# Altium PCB Sensors_Board.PcbDoc (part 2 of 2)
Units mil, origin at the board's own origin, x right, y up, seen from the top; angles counter-clockwise.
Board outline 3925 x 3925 mil, 2 copper layers (Top Layer, Bottom Layer); 82 components, 60 nets, 229 pads, 66 vias.
Unrouted connection lines stored in the file: 61.
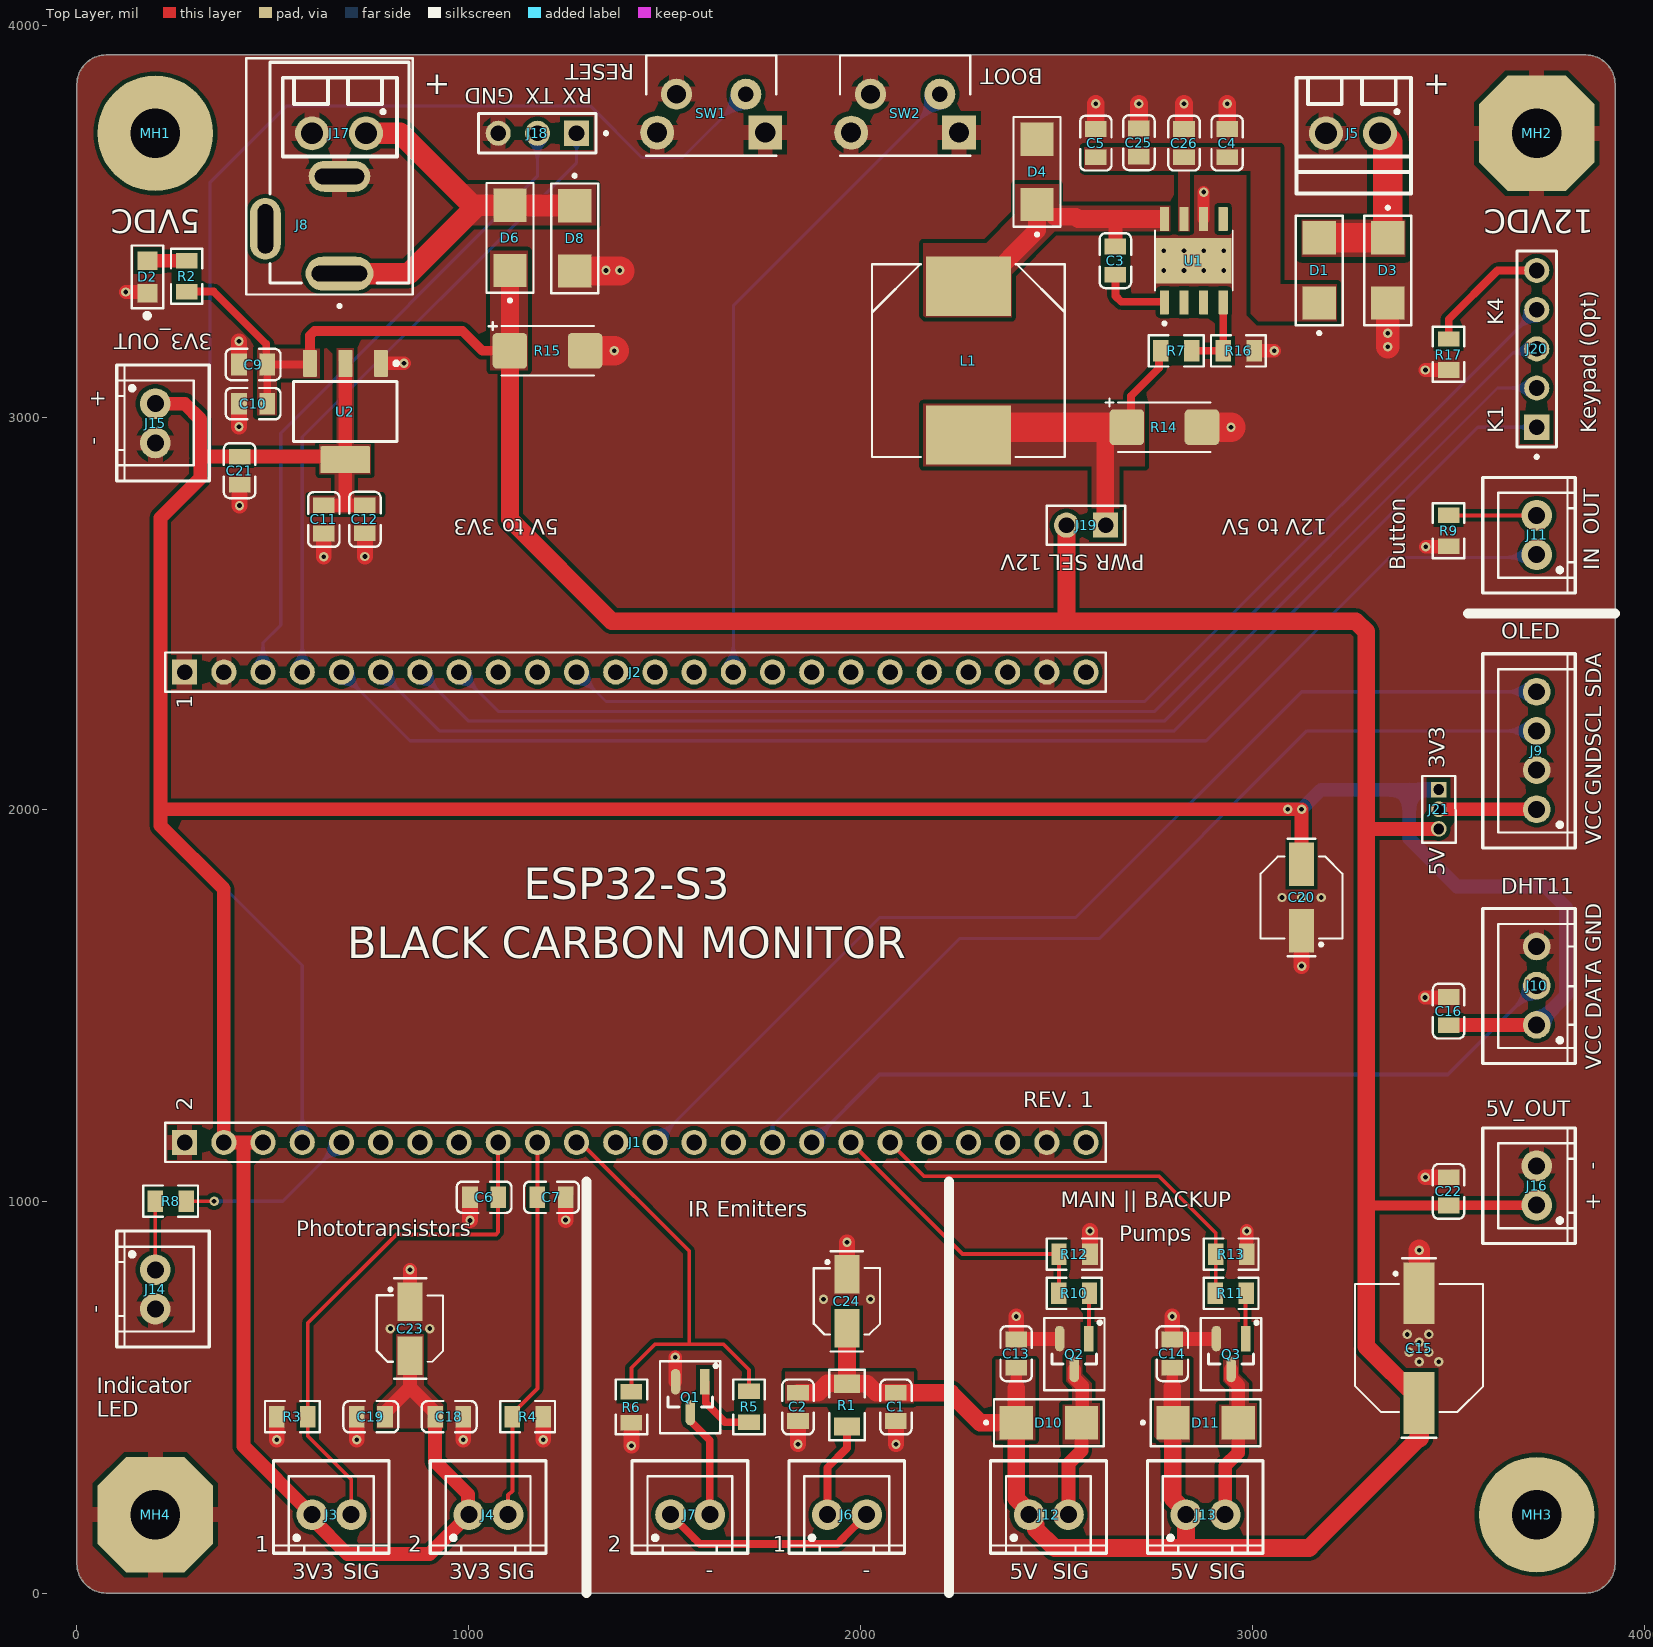
[diagram p0: Top Layer view]

## Part data (continued)
R8: library part RC0805FR-07100RL, "RES 100 OHM 1% 1/8W 0805", Case/Package=0805, LCSC Part Number=C327455, Manufacturer=Yageo, Max Operating Temperature=155°C, Min Operating Temperature=-55°C, Package Height=0.5mm, Package Length=2mm, Package Shape=Rectangular, Package Width=1.25mm, Power=125mW, Rated Temperature=70°C, Resistor Type="FIXED RESISTOR", Supplier Part Number=311-100CRCT-ND, Temperature Coefficient=100ppm/°C, Tolerance=1%, Working Voltage=150V, Additional Feature="LASER TRIMMABLE", Category="Chip SMD Resistors", ComponentLink1Description=https://datasheet.ciiva.com:443/pdfs/VipMasterIC/IC/YAGO/YAGO-S-A0008145938/YAGO-S-A0008145938-1.pdf?src-supplier=IHS+Markit, ComponentLink1URL=https://datasheet.ciiva.com:443/pdfs/VipMasterIC/IC/YAGO/YAGO-S-A0008145938/YAGO-S-A0008145938-1.pdf?src-supplier=IHS+Markit, ComponentLink2Description=https://datasheet.ciiva.com/11808/0900766b8106beab-11808877.pdf?src-supplier=Rs, ComponentLink2URL=https://datasheet.ciiva.com/11808/0900766b8106beab-11808877.pdf?src-supplier=Rs, ComponentLink3Description=https://datasheet.ciiva.com/7941/1697719-7941680.pdf?src-supplier=Element14, ComponentLink3URL=https://datasheet.ciiva.com/7941/1697719-7941680.pdf?src-supplier=Element14, ComponentLink4Description=https://datasheet.ciiva.com/7941/1686128-7941679.pdf?src-supplier=Element14, ComponentLink4URL=https://datasheet.ciiva.com/7941/1686128-7941679.pdf?src-supplier=Element14, ComponentLink5Description=https://datasheet.ciiva.com/46447/444164-46447562.pdf?src-supplier=Element14, ComponentLink5URL=https://datasheet.ciiva.com/46447/444164-46447562.pdf?src-supplier=Element14, ComponentLink6Description=https://datasheet.ciiva.com/2456/pyu-r-int-thick-7-2456989.pdf?src-supplier=Digikey, ComponentLink6URL=https://datasheet.ciiva.com/2456/pyu-r-int-thick-7-2456989.pdf?src-supplier=Digikey, ComponentLink7Description=https://datasheet.ciiva.com/2456/pyu-r-int-thick-7-2456987.pdf?src-supplier=Digikey, ComponentLink7URL=https://datasheet.ciiva.com/2456/pyu-r-int-thick-7-2456987.pdf?src-supplier=Digikey, ComponentLink8Description=https://datasheet.ciiva.com/17082/rc0805-17082697.pdf?src-supplier=Future+Electronics, ComponentLink8URL=https://datasheet.ciiva.com/17082/rc0805-17082697.pdf?src-supplier=Future+Electronics, ComponentLink9Description=https://datasheet.ciiva.com/7660/38627-7660797.pdf?src-supplier=Element14, ComponentLink9URL=https://datasheet.ciiva.com/7660/38627-7660797.pdf?src-supplier=Element14, ComponentLink10Description=https://datasheet.ciiva.com/22747/444164-22747535.pdf?src-supplier=Element14, ComponentLink10URL=https://datasheet.ciiva.com/22747/444164-22747535.pdf?src-supplier=Element14, ComponentLink11Description=https://datasheet.ciiva.com/2456/pyu-r-int-thick-7-2456988.pdf?src-supplier=Digikey, ComponentLink11URL=https://datasheet.ciiva.com/2456/pyu-r-int-thick-7-2456988.pdf?src-supplier=Digikey, Construction=Chip, JESD-609 Code=e3, Manufacturer Part Number=RC0805FR-07100RL, Mounting Technology="Surface Mount", Packaging="Tape and Reel", Pins=2, Pricing="1=0.1, 10=0.017, 50=0.0158, 100=0.0143, 500=0.0102, 1000=0.00816, 5000=0.0051, 10000=0.00408 (USD)", Reach SVHC Compliant=Yes, RoHS=Yes, RoHS Compliant=Yes, Stock=1132709, Supplier=Digikey, Technology="METAL GLAZE/THICK FILM", Terminal Finish=Nickel, Termination=Wraparound
R10 R11: library part CRGCQ0805F220R, "RES 220 OHM 1% 1/8W 0805", LCSC Part Number=C374734, Manufacturer="TE Connectivity", Resistor Type="FIXED RESISTOR", Supplier Part Number=A129741CT-ND, Category="Chip SMD Resistors", ComponentLink1Description=https://datasheet.ciiva.com:443/pdfs/VipMasterIC/IC/TYEL/TYEL-S-A0004929575/TYEL-S-A0004929575-1.pdf?src-supplier=IHS+Markit, ComponentLink1URL=https://datasheet.ciiva.com:443/pdfs/VipMasterIC/IC/TYEL/TYEL-S-A0004929575/TYEL-S-A0004929575-1.pdf?src-supplier=IHS+Markit, ComponentLink2Description=https://www.te.com/commerce/DocumentDelivery/DDEController?Action=srchrtrv&amp;DocNm=1773204-3&amp;DocType=DS&amp;DocLang=English&src-supplier=Digikey, ComponentLink2URL=https://www.te.com/commerce/DocumentDelivery/DDEController?Action=srchrtrv&amp;DocNm=1773204-3&amp;DocType=DS&amp;DocLang=English&src-supplier=Digikey, ComponentLink3Description=https://4donline.ihs.com/images/VipMasterIC/IC/TYEL/TYEL-S-A0004929575/TYEL-S-A0004929575-1.pdf?hkey=52A5661711E402568146F3353EA87419&src-supplier=Farnell, ComponentLink3URL=https://4donline.ihs.com/images/VipMasterIC/IC/TYEL/TYEL-S-A0004929575/TYEL-S-A0004929575-1.pdf?hkey=52A5661711E402568146F3353EA87419&src-supplier=Farnell, ComponentLink4Description=https://4donline.ihs.com/images/VipMasterIC/IC/TYEL/TYEL-S-A0004929575/TYEL-S-A0004929575-1.pdf?hkey=52A5661711E402568146F3353EA87419&src-supplier=Newark, ComponentLink4URL=https://4donline.ihs.com/images/VipMasterIC/IC/TYEL/TYEL-S-A0004929575/TYEL-S-A0004929575-1.pdf?hkey=52A5661711E402568146F3353EA87419&src-supplier=Newark, ComponentLink5Description=https://datasheet.octopart.com/CRGCQ0805F220R-TE-Connectivity-datasheet-114679081.pdf?src-supplier=Master+Electronics, ComponentLink5URL=https://datasheet.octopart.com/CRGCQ0805F220R-TE-Connectivity-datasheet-114679081.pdf?src-supplier=Master+Electronics, Manufacturer Part Number=CRGCQ0805F220R, Pins=2, Pricing="1=0.1, 10=0.033, 50=0.0206, 100=0.0171, 500=0.01168, 1000=0.01008 (USD)", Reach SVHC Compliant=Yes, RoHS=Yes, RoHS Compliant=Yes, Stock=1167728, Supplier=Digikey
R14 R15: library part TAJC227K006RNJ, "Tantalum Capacitor, Polarized, Tantalum (dry/solid), 6.3V, 10% +Tol, 10% -Tol, 220uF, Surface Mount, 2312", Capacitor Type=Tantalum, Case/Package=2312, ESR (Equivalent Series Resistance)=1.2R, Leakage Current=13.9uA, Manufacturer="Kyocera AVX", Max Operating Temperature=125°C, Min Operating Temperature=-55°C, Package Shape=Rectangular, Package Style=SMTMeter, Rated DC Voltage (URdc)=6.3V, Supplier Part Number=478-1713-1-ND, Tolerance  (fill in as +-)=10%, Category="Tantalum Capacitors", ComponentLink1Description=https://datasheet.ciiva.com:443/pdfs/VipMasterIC/IC/AVXC/AVXC-S-A0008794508/AVXC-S-A0008794508-1.pdf?src-supplier=IHS+Markit, ComponentLink1URL=https://datasheet.ciiva.com:443/pdfs/VipMasterIC/IC/AVXC/AVXC-S-A0008794508/AVXC-S-A0008794508-1.pdf?src-supplier=IHS+Markit, ComponentLink2Description=https://datasheet.ciiva.com/11793/0900766b80ccdc61-11793155.pdf?src-supplier=Rs, ComponentLink2URL=https://datasheet.ciiva.com/11793/0900766b80ccdc61-11793155.pdf?src-supplier=Rs, ComponentLink3Description=https://datasheet.ciiva.com/26341/559452-da-01-en-tacc-c-6-0-mm-x-3-2-mm-x-2-6-mm-220-uf-26341792.pdf?src-supplier=Conrad, ComponentLink3URL=https://datasheet.ciiva.com/26341/559452-da-01-en-tacc-c-6-0-mm-x-3-2-mm-x-2-6-mm-220-uf-26341792.pdf?src-supplier=Conrad, ComponentLink4Description=https://datasheet.ciiva.com/18710/taj-eng-18710873.pdf?src-supplier=Distrelec, ComponentLink4URL=https://datasheet.ciiva.com/18710/taj-eng-18710873.pdf?src-supplier=Distrelec, ComponentLink5Description=https://datasheet.ciiva.com/7773/1680476-7773710.pdf?src-supplier=Element14, ComponentLink5URL=https://datasheet.ciiva.com/7773/1680476-7773710.pdf?src-supplier=Element14, ComponentLink6Description=https://datasheet.ciiva.com/7773/1680476-7773711.pdf?src-supplier=Element14, ComponentLink6URL=https://datasheet.ciiva.com/7773/1680476-7773711.pdf?src-supplier=Element14, ComponentLink7Description=https://datasheet.ciiva.com/5935/13070-5935479.pdf?src-supplier=Farnell, ComponentLink7URL=https://datasheet.ciiva.com/5935/13070-5935479.pdf?src-supplier=Farnell, ComponentLink8Description=https://datasheet.ciiva.com/264/taj-264613.pdf?src-supplier=Digikey, ComponentLink8URL=https://datasheet.ciiva.com/264/taj-264613.pdf?src-supplier=Digikey, ComponentLink9Description=https://datasheet.ciiva.com/264/taj-264612.pdf?src-supplier=Digikey, ComponentLink9URL=https://datasheet.ciiva.com/264/taj-264612.pdf?src-supplier=Digikey, ComponentLink10Description=https://datasheet.ciiva.com/264/taj-264614.pdf?src-supplier=Digikey, ComponentLink10URL=https://datasheet.ciiva.com/264/taj-264614.pdf?src-supplier=Digikey, ComponentLink11Description=https://datasheet.ciiva.com/12883/taj-27497-12883273.pdf?src-supplier=Mouser, ComponentLink11URL=https://datasheet.ciiva.com/12883/taj-27497-12883273.pdf?src-supplier=Mouser, ComponentLink12Description=https://datasheet.ciiva.com/14600/70001050-14600889.pdf?src-supplier=Allied+Electronics, ComponentLink12URL=https://datasheet.ciiva.com/14600/70001050-14600889.pdf?src-supplier=Allied+Electronics, ComponentLink13Description=https://datasheet.ciiva.com/14599/70001050-14599311.pdf?src-supplier=Allied+Electronics, ComponentLink13URL=https://datasheet.ciiva.com/14599/70001050-14599311.pdf?src-supplier=Allied+Electronics, ComponentLink14Description=https://datasheet.ciiva.com/16492/taj-16492906.pdf?src-supplier=Future+Electronics, ComponentLink14URL=https://datasheet.ciiva.com/16492/taj-16492906.pdf?src-supplier=Future+Electronics, Dielectric Material=Tantalum, Height=2.6mm, JESD-609 Code=e3, Length=6mm, Manufacturer Part Number=TAJC227K006RNJ, Mounting Technology="Surface Mount", Packaging="Tape and Reel", Pins=2, Polarity=Polarized, Pricing="1=0.91, 10=0.555, 50=0.4142, 100=0.3705, 500=0.29584, 1000=0.27254, 1500=0.26081, 2500=0.24777, 3500=0.24011, 5000=0.23273, 12500=0.21674, 25000=0.20703, 50000=0.19899 (USD)", Reach SVHC Compliant=Yes, Reference Standard=CECC30801-005, RoHS=Yes, RoHS Compliant=Yes, Stock=3416, Supplier=Digikey, Tan Delta=0.08, Terminal Finish=Nickel, Termination="J BEND", Tolerance (fill in as +-)=10%, Width=3.2mm
R16: library part RC0805FR-073K3L, "125mW ±1% 3.3kΩ 0805 Chip Resistor - Surface Mount ROHS", Case/Package=0805, LCSC Part Number=C269541, Manufacturer=Yageo, Max Operating Temperature=155°C, Min Operating Temperature=-55°C, Package Height=0.5mm, Package Length=2mm, Package Shape=Rectangular, Package Width=1.25mm, Power=125mW, Rated Temperature=70°C, Resistor Type="FIXED RESISTOR", Supplier Part Number=311-3.30KCRCT-ND, Temperature Coefficient (ppm/Cel)=100, Tolerance=1%, Working Voltage=150V, Additional Feature="LASER TRIMMABLE", Category="Chip SMD Resistors", ComponentLink1Description=https://datasheet.ciiva.com:443/pdfs/VipMasterIC/IC/YAGO/YAGO-S-A0008145938/YAGO-S-A0008145938-1.pdf?src-supplier=IHS+Markit, ComponentLink1URL=https://datasheet.ciiva.com:443/pdfs/VipMasterIC/IC/YAGO/YAGO-S-A0008145938/YAGO-S-A0008145938-1.pdf?src-supplier=IHS+Markit, Construction=Chip, JESD-609 Code=e3, Manufacturer Part Number=RC0805FR-073K3L, Mounting Technology="Surface Mount", Packaging="Tape and Reel", Pins=2, Pricing="1=0.1, 10=0.016, 50=0.0132, 100=0.0102, 500=0.00868, 1000=0.00781 (USD)", Reach SVHC Compliant=Yes, RoHS=Yes, RoHS Compliant=Yes, Stock=1112941, Supplier=Digikey, Technology="METAL GLAZE/THICK FILM", Terminal Finish=Nickel, Termination=Wraparound
SW1 SW2: "Tactile Switch SPST-NO Side Actuated Through Hole, Right Angle"
U1: "Step-down type Adjustable 1.221V~32.04V 3A 5.5V~36V SOIC-8-EP DC-DC Converters ROHS", Case/Package=HLSOP, Frequency=600kHz, LCSC Part Number=C9864, Manufacturer="Texas Instruments", Max Operating Temperature=125°C, Max Output current=6A, Max Supply Voltage=36V, Min Input Voltage=5.5V, Min Operating Temperature=-40°C, Nominal Supply Voltage=12V, Package Body Material=Plastic, Package Equivalence Code=SOP8,.25, Package Shape=Rectangular, Package Style="SMALL OUTLINE, HEAT SINK/SLUG, LOW PROFILEMeter", Peak Reflow Temperature (Cel)=260°C, Supplier Part Number=296-26988-1-ND, Temperature Grade=AUTOMOTIVE, Category="Voltage Regulators - Switching", Channels=1, ComponentLink1Description=https://www.ti.com:443/lit/ds/symlink/tps5430.pdf?src-supplier=IHS+Markit, ComponentLink1URL=https://www.ti.com:443/lit/ds/symlink/tps5430.pdf?src-supplier=IHS+Markit, ComponentLink2Description=https://datasheet.ciiva.com/27052/1523997-27052321.pdf?src-supplier=Jameco, ComponentLink2URL=https://datasheet.ciiva.com/27052/1523997-27052321.pdf?src-supplier=Jameco, ComponentLink3Description=https://datasheet.ciiva.com/15113/getdatasheetpartid-214658-15113401.pdf?src-supplier=Verical, ComponentLink3URL=https://datasheet.ciiva.com/15113/getdatasheetpartid-214658-15113401.pdf?src-supplier=Verical, ComponentLink4Description=https://datasheet.ciiva.com/41462/001014839-da-01-en-ic-reg-buck-adj-3-tps5430ddar-soic-8-tid-41462684.pdf?src-supplier=Conrad, ComponentLink4URL=https://datasheet.ciiva.com/41462/001014839-da-01-en-ic-reg-buck-adj-3-tps5430ddar-soic-8-tid-41462684.pdf?src-supplier=Conrad, ComponentLink5Description=https://datasheet.ciiva.com/2035/tps5431-2035207.pdf?src-supplier=Digikey, ComponentLink5URL=https://datasheet.ciiva.com/2035/tps5431-2035207.pdf?src-supplier=Digikey, ComponentLink6Description=https://datasheet.ciiva.com/2035/tps5431-2035206.pdf?src-supplier=Digikey, ComponentLink6URL=https://datasheet.ciiva.com/2035/tps5431-2035206.pdf?src-supplier=Digikey, ComponentLink7Description=https://datasheet.ciiva.com/2035/tps5431-2035208.pdf?src-supplier=Digikey, ComponentLink7URL=https://datasheet.ciiva.com/2035/tps5431-2035208.pdf?src-supplier=Digikey, Control Mode=VOLTAGE-MODE, Control Technique="PULSE WIDTH MODULATION", Height - Seated (Max)=1.68mm, JESD-30 Code=R-PDSO-G8, JESD-609 Code=e4, Length=4.89mm, Manufacturer Part Number=TPS5430DDAR, Moisture Sensitivity Level=1, Pins=8, Pricing="1=4, 10=3.024, 25=2.78, 100=2.5118, 250=2.38388, 500=2.30678, 1000=2.24331, 2500=2.1763 (USD)", Qualification Status="Not Qualified", Reach SVHC Compliant=Yes, RoHS=Yes, RoHS Compliant=Yes, Stock=3440, Supplier=Digikey, Surface Mount=Yes, Switcher Configuration=BUCK, Technology=MOS, Terminal Finish=Nickel, Terminal Form="Gull Wing", Terminal Pitch=1.27mm, Terminal Position=DUAL, Throw Configuration="SWITCHING REGULATOR", Width=3.9mm
U2: "IC REG LINEAR 3.3V 800MA SOT223", LCSC Number Part=C411821, Manufacturer="TI National Semiconductor", Supplier Part Number=LM1117MP-3.3/NOPBCT-ND, Category="Voltage Regulators - Linear", Manufacturer Part Number=LM1117MP-3.3/NOPB, Pricing="1=1.38, 10=1.007, 25=0.9128, 100=0.8093, 250=0.75996, 500=0.73016 (USD)", RoHS=Yes, Stock=63878, Supplier=Digikey

## Via types
v1: diameter 24, hole 12, Top Layer to Bottom Layer, tented both sides, 66 vias

## Nets (pads, with @x,y where several pads share a name; then routed paths per layer and width w, separated by ;. In a path a pad name is that pad's centre, name@x,y a point inside that pad or via, vN(x,y) a via of type N, cw(c..) or ccw(c..) an arc to the next point about the centre after c; other vN are vias at no path point)
3V3: C11.2 C12.2 C16.2 C18.2 C19.2 C20.1 C21.2 C23.1 J1.2 J1.3 J3.1 J4.1 J10.1 J15.1 J21.1 U2.2 U2.4 | length 9690.3
  Top Layer w35: J15.1 275,3035 315,2995 315,2900 ; J1.3 425,1150 ; C11.2 630.43,2776 685,2776 ; U2.2 U2.4 ; C12.2 685,2776 ; C19.2 788.5,452.5 788.5,463.5 842.07,517.07 ; C23.1@850,600 850,525 911.5,463.5 911.5,452.5 C18.2 914,336 997.82,252.18 997.82,202.18 J4.1 900,100 690,100 600,190 J3.1 425,375 425,1150 ; C20.1@3125,1866.14 v1(3125,2000) 213.5,2000 ; C16.2 3500.5,1449.5 3724.5,1449.5 J10.1 ; 213.5,2000 213.5,2743.5 315,2845 315,2892.5 322.5,2900 C21.2 676.97,2900 U2.4 ; 213.5,2000 213.5,1958.17 375,1796.67 J1.2 425,1150 ; 685,2776 U2.4
  Bottom Layer w35: v1(3090,2000) v1(3125,2000) 3175,2050 3400,2050 ; J21.1 3400,2050 ; J10.1 3800,1525 3800,1750 3746.8,1803.2 3521.8,1803.2 3400,1925 3400,2050
5V: C1.2 C2.2 C9.2 C10.2 C13.2 C14.2 C15.1 C22.2 C24.1 D6.2 D10.2 D11.2 J12.1 J13.1 J16.1 J19.2 J21.3 R1.1 R2.2 R15.1 U2.3 | length 9813
  Top Layer w20: R2.2 349,3321 483.07,3186.93 483.07,3137.5 C9.2 ; C10.2 C9.2 ; U2.3 591.42,3135 C9.2
  Top Layer w25: U2.3 594.45,3208.99 606.16,3220.71 984.29,3220.71 1035,3170 R15.1 R15.1@1105,3171.57 ; 3290,989 C22.2 3500.5,989.5 3724.5,989.5 J16.1
  Top Layer w30: 2396.73,523.27 C13.2 ; 2795,525 C14.2
  Top Layer w35: 3290,1950 J21.3
  Top Layer w45: R15.1 1105,2740 1365,2480 2525,2480 ; R15.1@1105,3171.57 D6.2 ; C2.2 1891,511 1915,535 1964.37,535 R1.1 ; C24.1@1965,660 R1.1 ; 2396.73,523.27 D10.2 ; J12.1@2430,196.86 J12.1 ; J19.2 2525,2480 ; D11.2@2795,436.73 2795,525 ; D11.2 2796.73,240.27 2830,207 J13.1 2830,130 ; 2827.07,127.07 2830,130 ; 3425,396 3156.07,127.07 3144,115 2815,115 ; C15.1 3425,494.37 3290,629.37 3290,989 3290,1950 3290,2453.64 3263.64,2480 2525,2480 ; R1.1 2016.43,534.37 2039.79,511 C1.2 2229,511 2305,435 D10.2 ; D10.2 2396.73,240.27 2430,207 J12.1 ; J12.1 2430,190.87 2446.87,174 2446.87,163.13 2495,115 2815,115 ; 2815,115 2830,130
  Top Layer w50: 3425,396 C15.1
5V_Ext: D6.1 D8.2 J8.1 J17.1 | length 1037.4
  Top Layer w55: J8.1 846.97,3366.97 1021.54,3541.54 ; J17.1 825,3725 1008.46,3541.54 1021.54,3541.54 ; D8.2@1273.34,3536.66 D8.2 1269.23,3540.77 1105.77,3540.77 D6.1 1021.54,3541.54
5V_SW: J19.1 L1.2 R7.2 R14.1 | length 893.8
  Top Layer w20: L1.2 L1.2@2295,2975 ; 2624,2975 2625,2974 ; R14.1 2690,2985.87 2690,3055 2760.79,3125.79 2760.79,3164.79 R7.2
  Top Layer w45: J19.1@2624,2726 2624,2975
  Top Layer w75: L1.2@2295,2975 2624,2975 R14.1
12V_Ext: D1.1 D3.2 J5.1 | length 450
  Top Layer w75: D1.1 D3.2 3345,3701.86 3325,3721.86 J5.1
CON_GPIO0: J2.15 SW2.1 | length 1710.6
  Top Layer w10: SW2.1@2189.95,3812.79 SW2.1
  Bottom Layer w8: J2.15 1675,3285 2202.17,3812.17 SW2.1
CON_HEADER_N: J2.21
CON_HEADER_P: J2.20
EN: J1.4 SW1.1 | length 4225.6
  Top Layer w35: SW1.1@1707.17,3813.16 SW1.1
  Bottom Layer w8: J1.4 575,1601.45 223,1953.45 223,2733 340,2850 340,3600 535,3795 1310,3795 1441.73,3663.27 1545.43,3663.27 SW1.1
GND: C1.1 C2.1 C4.1 C5.1 C6.1 C7.1 C9.1 C10.1 C11.1 C12.1 C13.1 C14.1 C15.2 C16.1 C18.1 C19.1 C20.2 C21.1 C22.1 C23.2 C24.2 C25.1 C26.2 D2.2 D3.1 D4.1 D8.1 J1.1 J1.23 J2.1 J2.2 J2.23 J5.2 J8.2 J9.2 J10.3 J14.2 J15.2 J16.2 J17.2 J18.3 MH2.1 MH4.1 Q1.2 Q2.2 Q3.2 R3.1 R4.1 R6.1 R9.1 R12.1 R13.1 R14.2 R15.2 R16.1 R17.1 SW1.2 SW1.S1 SW1.S2 SW2.2 SW2.S1 SW2.S2 U1.6 U1.9 U2.1 | length 2611.6
  Top Layer w20: Q1.2@1526.91,540.08 Q1.2
  Top Layer w30: 2600,3761 2605,3756 ; U1.6 v1(2875,3575)
  Top Layer w35: v1(125,3320) 177.32,3320 D2.2 ; U2.1 v1(834.55,3138.03) ; C23.2@850,769.29 v1(850,825) ; Q1.2@1526.91,540.08 v1(1526.91,602.01) ; C13.1 2397.93,648.2 Q2.2@2500,648.2 ; C14.1 2796.2,648.2 Q3.2@2900,648.2 ; R13.1 v1(2985,924) ; R16.1 v1(3055,3170) ; v1(3440,1520) 3499,1520 C16.1 ; v1(3441,3121) R17.1 ; v1(3441.59,2669.8) R9.1@3500.59,2669.8
  Top Layer w40: v1(413.57,2976) C10.1 ; C9.1 v1(413.57,3194) ; v1(415,2775) C21.1 ; v1(510,391) R3.1 ; v1(630,2644.57) C11.1 ; v1(714,391) C19.1 ; v1(735,2645) C12.1 ; v1(986,391) C18.1 ; v1(1003,951) C6.1 ; v1(1190,391) R4.1 ; v1(1247,952) C7.1 ; v1(1415,376) R6.1 ; v1(1840,380) C2.1 ; C24.2@1965,829.29 v1(1965,895) ; v1(2090,380) C1.1 ; C13.1 v1(2396.73,706) ; R12.1 v1(2585,924) ; C14.1 v1(2795,706) ; v1(3125,1600) C20.2@3125,1675 ; v1(3441,1061) C22.1
  Top Layer w45: 2600,3761 v1(2600,3800) ; 2710,3762 v1(2710,3800) ; 2825,3761 v1(2825,3800) ; 2935,3761 v1(2935,3800)
  Top Layer w55: C15.2@3425,796.26 v1(3425,875)
  Top Layer w60: v1(3345,3180) v1(3345,3215) D3.1
  Top Layer w75: D8.1 v1@1385,3373.46 ; R15.2 v1(1370.87,3170) ; R14.2 v1(2945,2975)
  other v1: 3425,590 3475,590 3400,615 3450,615 3425,640 3395,660 3450,660 800,675 900,675 1905,750 2025,750 3075,1775 3125,1775 3175,1775 1350,3375 1385,3375 2773.23,3375 2825,3375 2875.59,3375 2926.77,3375 2825,3425 2875.59,3425 2773.23,3425.59 2926.77,3425.59
GPIO1: J2.5 J11.1 | length 3319.2
  Bottom Layer w8: J2.5 850,2175 2881.57,2175 3349.37,2642.8 3717.8,2642.8 J11.1
GPIO2: J2.6 J20.1 | length 3333.1
  Bottom Layer w8: J2.6 925,2200 2800,2200 3575,2975 J20.1
GPIO3: J1.14
GPIO4: J1.5 R8.1 | length 458.1
  Top Layer w8: R8.1 v1(350,1000)
  Bottom Layer w8: v1(350,1000) 525,1000 J1.5
GPIO5: J1.6
GPIO6: J1.7
GPIO7: J1.8
GPIO8: J1.13 J9.4 | length 2726.3
  Bottom Layer w8: J1.13 2049.34,1724.34 2549.34,1724.34 3125,2300 J9.4
GPIO9: J1.16 J9.3 | length 2410.1
  Bottom Layer w8: J1.16 1775,1193.01 2251.99,1670 2608.64,1670 3138.64,2200 J9.3
GPIO10: J1.17 J10.2 | length 2015.7
  Bottom Layer w10: J1.17 2048,1323 3498,1323 J10.2
GPIO11: J1.18 R10.1 R12.2 | length 749.5
  Top Layer w10: J1.18 2260,865 R12.2 2506,766 R10.1
GPIO12: J1.19 R11.1 R13.2 | length 1081.1
  Top Layer w10: J1.19 2161.42,1063.58 2761.42,1063.58 2906,919 2906,766 R11.1
GPIO13: J1.20
GPIO14: J1.21
GPIO15: C6.2 J1.9 J3.2 R3.2 | length 1346.2
  Top Layer w10: J3.2 700,290 589,401 R3.2 589,689 815,915 1069.14,915 1075,920.86 J1.9
GPIO16: C7.2 J1.10 J4.2 R4.2 | length 992.6
  Top Layer w10: J4.2@1108.16,208.16 J4.2 1100,250 1111,261 R4.2 1111,458 1175,522 C7.2 J1.10
GPIO17: J1.11 R5.1 R6.2 | length 1107.7
  Top Layer w10: J1.11 1285,1150 1562.5,872.5 1562.5,635 ; R6.2 1415,575 1475,635 1562.5,635 ; R5.1 1715,570 1650,635 1562.5,635
GPIO18: J1.12
GPIO21: J2.19
GPIO35: J2.14
GPIO36: J2.13
GPIO37: J2.12
GPIO38: J2.11 J20.4 | length 2895.3
  Bottom Layer w8: J2.11 1350,2275 2725,2275 J20.4
GPIO39: J2.10
GPIO40: J2.9
GPIO41: J2.8 J20.3 | length 3174.6
  Bottom Layer w8: J2.8 1075,2250 2750,2250 3664.66,3164.66 3714.66,3164.66 J20.3
GPIO42: J2.7 J20.2 | length 3253.9
  Bottom Layer w8: J2.7 1000,2225 2775,2225 3625,3075 J20.2
GPIO45: J2.16
GPIO46: J1.15
GPIO47: J2.18
GPIO48: J2.17
NetC3_1: C3.1 U1.1 | length 185.8
  Top Layer w20: C3.1 2650,3310 2665,3295 2773.7,3295 U1.1
NetC3_2: C3.2 D4.2 L1.1 U1.8 | length 677.6
  Top Layer w20: C3.2 2654,3436 C3.2@2650,3440 ; 2650,3494.58 2661.72,3506.3
  Top Layer w30: D4.2 2477.5,3515.96 2491.11,3515.96 2495.07,3512 ; 2549,3512 2554.7,3506.3
  Top Layer w35: C3.2@2650,3440 2650,3494.58
  Top Layer w45: L1.1@2307.71,3335 2450,3477.29 D4.2 ; 2495.07,3512 2549,3512 ; 2554.7,3506.3 2661.72,3506.3 U1.8@2764,3506.3
NetC4_2: C4.2 C5.2 C25.2 C26.1 D1.2 U1.7
NetD2_1: D2.1 R2.1 | length 100
  Top Layer w35: D2.1@187.83,3400 R2.1@287.83,3400
NetD10_1: D10.1 J12.2 Q2.3 | length 393.4
  Top Layer w35: J12.2 2530,330 2563.27,363.27 D10.1 2565,436.73 2565,528.93 2545,548.93 Q2.3
NetD11_1: D11.1 J13.2 Q3.3 | length 392
  Top Layer w20: 2963.27,530 2963.27,530.66
  Top Layer w35: J13.2 2930,325 2963.27,358.27 D11.1 2963.27,530 ; Q3.3 2945,548.93 2963.27,530.66
NetJ6_1: J6.1 R1.2 | length 245.7
  Top Layer w20: J6.1 1915,320 1965,370 R1.2
NetJ6_2: J6.2 J7.1 | length 562.1
  Top Layer w20: J7.1 1575.43,139.57 1590,125 1940,125 1954.57,139.57 J6.2
NetJ7_2: J7.2 Q1.3 | length 281.3
  Top Layer w20: Q1.3 1565,440.04 1615,390.04 J7.2
NetJ11_2: J11.2 R9.2 | length 230.7
  Top Layer w10: R9.2@3500,2746 R9.2 ; R9.2@3500,2754 3504,2750 J11.2
NetJ14_1: J14.1 R8.2 | length 175
  Top Layer w8: J14.1 R8.2
NetJ20_5: J20.5 R17.2 | length 326.8
  Top Layer w20: R17.2 3500.62,3200.62 3500.62,3250.62 3625,3375 J20.5
NetQ1_1: Q1.1 R5.2 | length 185.8
  Top Layer w20: Q1.1 1604.45,537.34 1604.45,485.55 1654,436 R5.2
NetQ2_1: Q2.1 R10.2 | length 116.3
  Top Layer w10: Q2.1 2582.4,763.4 R10.2
NetQ3_1: Q3.1 R11.2 | length 116.3
  Top Layer w10: Q3.1 2982.4,763.4 R11.2
NetR7_1: R7.1 R16.2 U1.4 | length 208.7
  Top Layer w20: R7.1@2840,3170 R7.1 R16.2 U1.4
RXD0: J2.4 J18.1 | length 1664.9
  Bottom Layer w8: J2.4 575,2950 1275,3650 J18.1
TXD0: J2.3 J18.2 | length 1664.9
  Bottom Layer w8: J2.3 475,2425 520,2470 520,2960 1175,3615 J18.2
VCC: J9.1 J21.2 | length 250
  Top Layer w35: J21.2 J9.1
pads on no net: J1.22 J1.24 J2.22 J2.24 J8.3 MH1.1 MH3.1 U1.2 U1.3 U1.5

## Polygon pours and split planes (outlines as drawn)
5V on Top Layer "5V_L01_P007" (solid, pour order 7): 2345,595 2445,595 2445,390 2345,390
GND on Top Layer "GND_L01_P045" (solid, remove dead copper, pour order 45): 0,75 0,3850 cw(c75,3850) 75,3925 3850,3925 cw(c3850,3850) 3925,3850 3925,75 cw(c3850,75) 3850,0 75,0 cw(c75,75)
12V_Ext on Top Layer "12V_EXT_L01_P044" (solid, pour order 44): 3125,3505 3390,3505 3390,3410 3125,3410
NetD11_1 on Top Layer "NETD11_1_L01_P043" (solid, pour order 43): 2965,605 2965,560 2990,535 2990,485 3010,485 3010,380 2915,380 2915,480 2940,480 2940,525 2925,540 2925,605
NetD10_1 on Top Layer "NETD10_1_L01_P042" (solid, pour order 42): 2565,605 2565,560 2590,535 2590,485 2610,485 2610,380 2515,380 2515,480 2540,480 2540,525 2525,540 2525,605
3V3 on Top Layer "3V3_L01_P041" (solid, pour order 41): 815,660 885,660 885,530 935,480 935,420 765,420 765,480 815,530
5V on Top Layer "5V_L01_P040" (solid, pour order 40): 1807.5,485 1807.5,565 2135,565 2135,485
3V3 on Top Layer "Top Layer-3V3" (solid, pour order 39): 592.5,2755 777.5,2755 777.5,2800 707.5,2800 707.5,2855 750,2855 750,2932 706,2932 706,3177 663.5,3177 662.5,2932 619,2932 619,2855 657.5,2855 657.5,2800 592.5,2800
5V on Top Layer "5V_L01_P037" (solid, pour order 37): 510,3005 460,3005 460,3175 620,3175 620,3100 510,3100
5V on Top Layer "5V_L01_P036" (solid, pour order 36): 1055,3425 1150,3425 1150,3120 1055,3120
5V_Ext on Top Layer "5V_EXT_L01_P035" (solid, pour order 35): 1325,3595 1325,3490 985,3490 985,3595
5V_SW on Top Layer "Top Layer-5V_SW" (solid, pour order 26): 2590,2690 2660,2690 2660,2875 2725,2875 2725,3035 2160,3035 2160,2875 2590,2875
NetC3_2 on Top Layer "Top Layer-NetC3_2" (solid, pour order 29): 2165,3255 2385,3255 2385,3365 2495,3475 2790,3475 2790,3540 2510,3540 2505,3545 2505,3595 2395,3595 2395,3520 2320,3445 2160,3445 2160,3260
NetC4_2 on Top Layer "Top Layer-NetC4_2" (solid, pour order 24): 2810,3475 2840,3475 2840,3630 2995,3630 2995,3265 3015,3245 3215,3245 3215,3340 3070,3340 3070,3690 2570,3690 2570,3630 2810,3630
5V on Top Layer "5V_L01_P008" (solid, pour order 8): 2750.89,595 2840,595 2840,385 2749.11,385
GND on Bottom Layer "GND_L02_P047" (solid, remove dead copper, pour order 47): 0,75 0,3850 cw(c75,3850) 75,3925 3850,3925 cw(c3850,3850) 3925,3850 3925,75 cw(c3850,75) 3850,0 75,0 cw(c75,75)

## Silkscreen, mask and mechanical layers (free items; w line width, h text height)
Top Overlay:
  lines w25: 1300,0 1300,1050 ; 2225,0 2225,1050 ; 3550,2500 3925,2500
  text "RESET" at 1422.4,3900.75 h40 r180
  text "BOOT" at 2465,3890 h40 r180
  text "GND" at 1115,3840 h40 r180
  text "TX" at 1215,3840 h40 r180
  text "RX" at 1315,3840 h40 r180
  text "+" at 885,3825 h60
  text "+" at 3435,3825 h60
  text "5VDC" at 315,3530 h60 r180
  text "12VDC" at 3870,3530 h60 r180
  text "K4" at 3640,3235 h40 r90
  text "3V3_OUT" at 345,3213.34 h40 r180
  text "+" at 71.66,3025 h40 r90
  text "K1" at 3640,2960 h40 r90
  text "Keypad (Opt)" at 3876.67,2960 h40 r90
  text "-" at 30.01,2950 h40 r270
  text "5V to 3V3" at 1230,2740 h40 r180
  text "12V to 5V" at 3190,2740 h40 r180
  text "OUT" at 3885,2700 h40 r90
  text "PWR SEL 12V" at 2725,2650 h40 r180
  text "Button" at 3390,2610 h40 r90
  text "IN" at 3885,2610 h40 r90
  text "OLED" at 3635,2435 h40
  text "SDA" at 3890,2285 h40 r90
  text "SCL" at 3890,2160 h40 r90
  text "3V3" at 3490,2105 h40 r90
  text "GND" at 3890,2035 h40 r90
  text "VCC" at 3890,1910 h40 r90
  text "5V" at 3490,1830 h40 r90
  text "DHT11" at 3635,1785 h40
  text "ESP32-S3" at 1140,1770 h80
  text "GND" at 3890,1635 h40 r90
  text "BLACK CARBON MONITOR" at 690,1620 h80
  text "DATA" at 3890,1465 h40 r90
  text "VCC" at 3890,1335 h40 r90
  text "REV. 1" at 2415,1240 h40
  text "5V_OUT" at 3595,1216.66 h40
  text "-" at 3884.99,1080 h40 r90
  text "MAIN || BACKUP" at 2510,985 h40
  text "+" at 3886.66,975 h40 r90
  text "IR Emitters" at 1560,960 h40
  text "Phototransistors" at 560,910 h40
  text "Pumps" at 2660,898.33 h40
  text "-" at 35.01,735 h40 r270
  text "Indicator / LED" at 50,450 h40
  text "1" at 455,105 h40
  text "2" at 845,105 h40
  text "2" at 1355,105 h40
  text "1" at 1775,105 h40
  text "-" at 1605,40.01 h40
  text "-" at 2005,40.01 h40
  text "3V3" at 550,35 h40
  text "SIG" at 680,35 h40
  text "3V3" at 950,35 h40
  text "SIG" at 1075,35 h40
  text "5V" at 2380,35 h40
  text "SIG" at 2490,35 h40
  text "5V" at 2790,35 h40
  text "SIG" at 2890,35 h40
Bottom Overlay:
  text "DO NOT BRIDGE IF THE 5V PWR JACK IS USED" at 1810,2865 h40 r180
  text "ESP32-S3" at 1760,1770 h80
  text "BLACK CARBON MONITOR" at 2260,1620 h80
  text "Distance 1200mil" at 2635,1240 h40
  text "REV. 1" at 465,1235 h40
Board Shape:
  the board outline again, w20

## Text inside footprints (layer, text, board x,y; h text height)
J1: Top Overlay "2" at 294,1231 h40 r90
J2: Top Overlay "1" at 294,2256 h40 r90